# Altium PCB Sensor_Board_v1.0.PcbDoc
Units mil, origin at the board's own origin, x right, y up, seen from the top; angles counter-clockwise.
Board outline 1771.72 x 2087.93 mil, 4 copper layers (Top Layer, PWR, GND, Bottom Layer), stack 61.654 mil thick; 32 components, 20 nets, 104 pads, 98 vias.
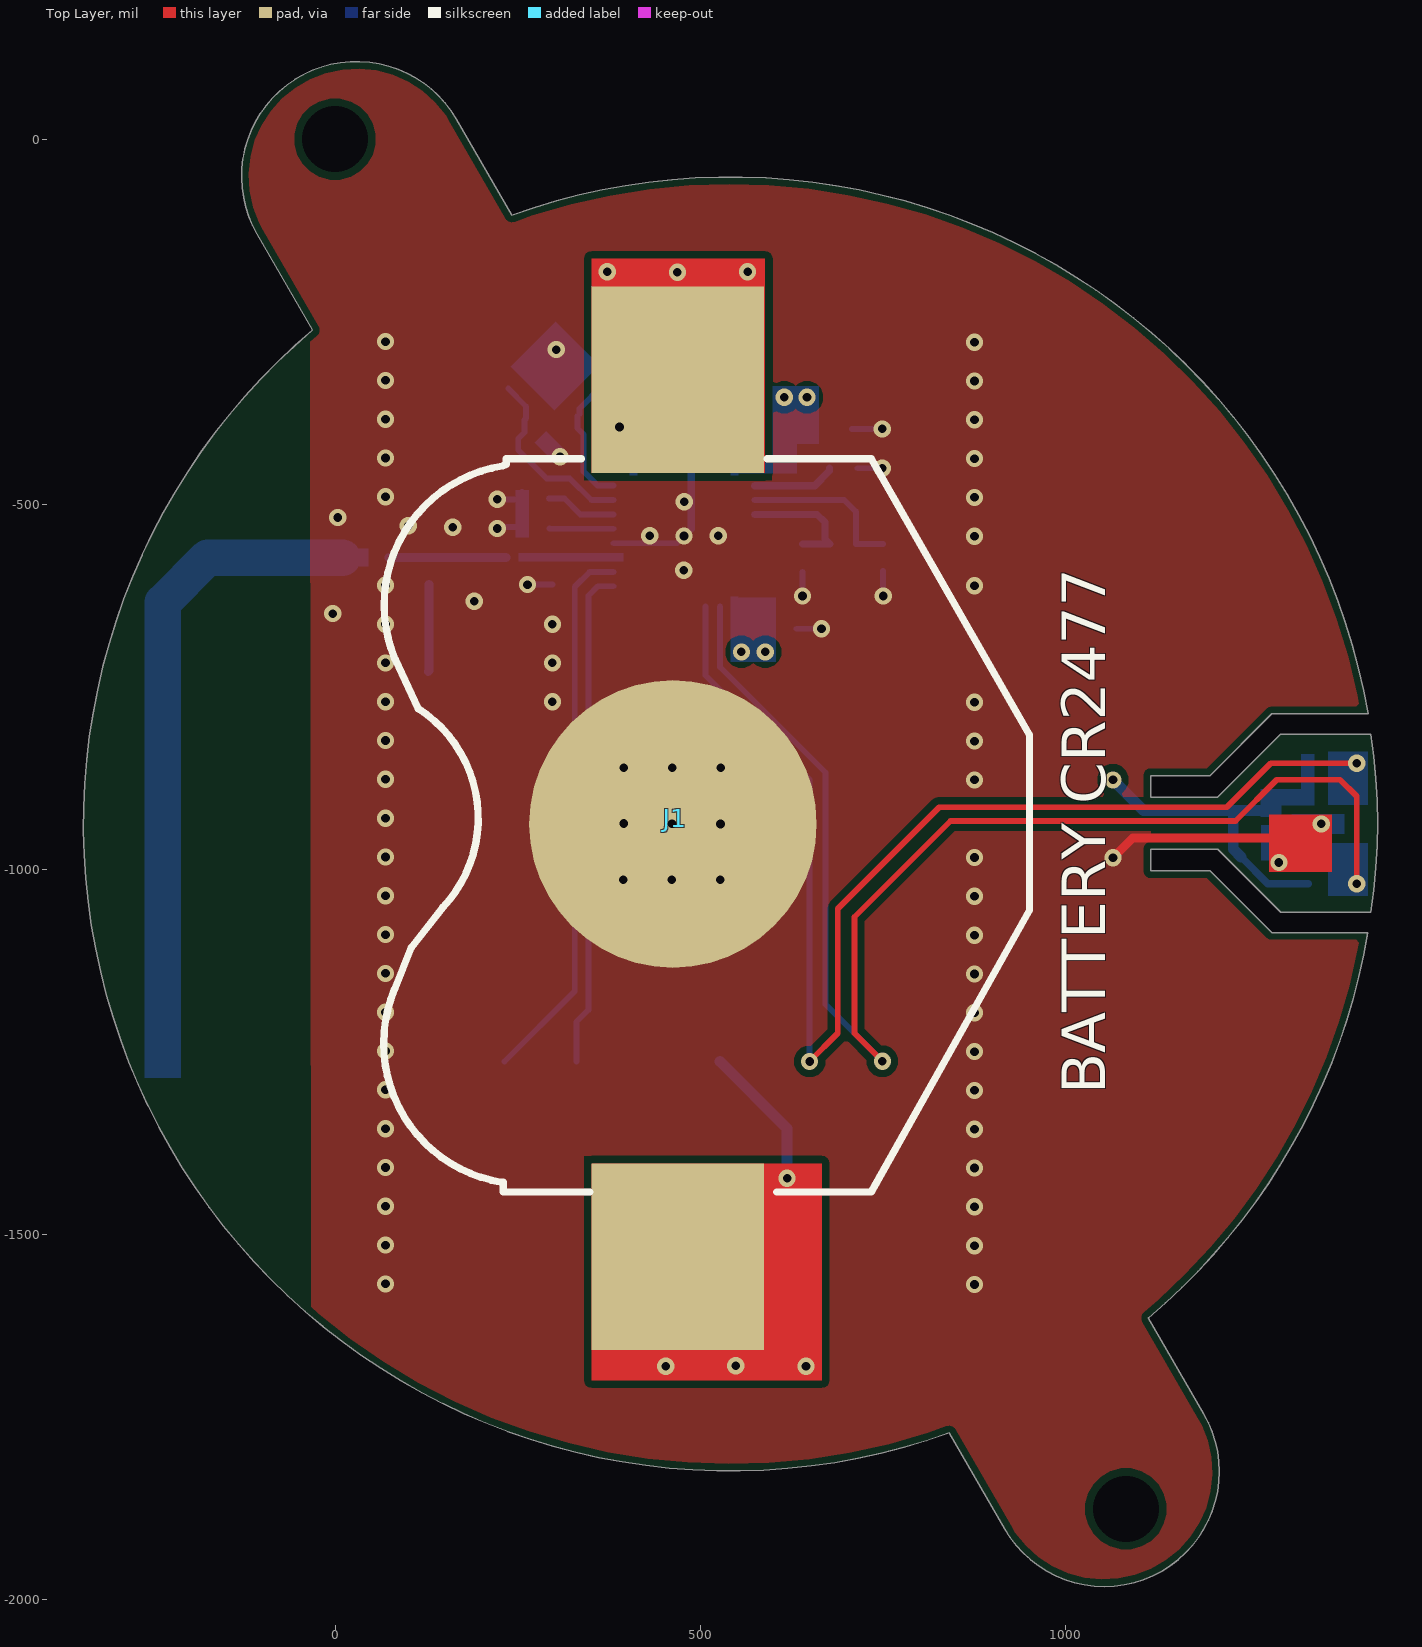
[diagram p0: Top Layer view]
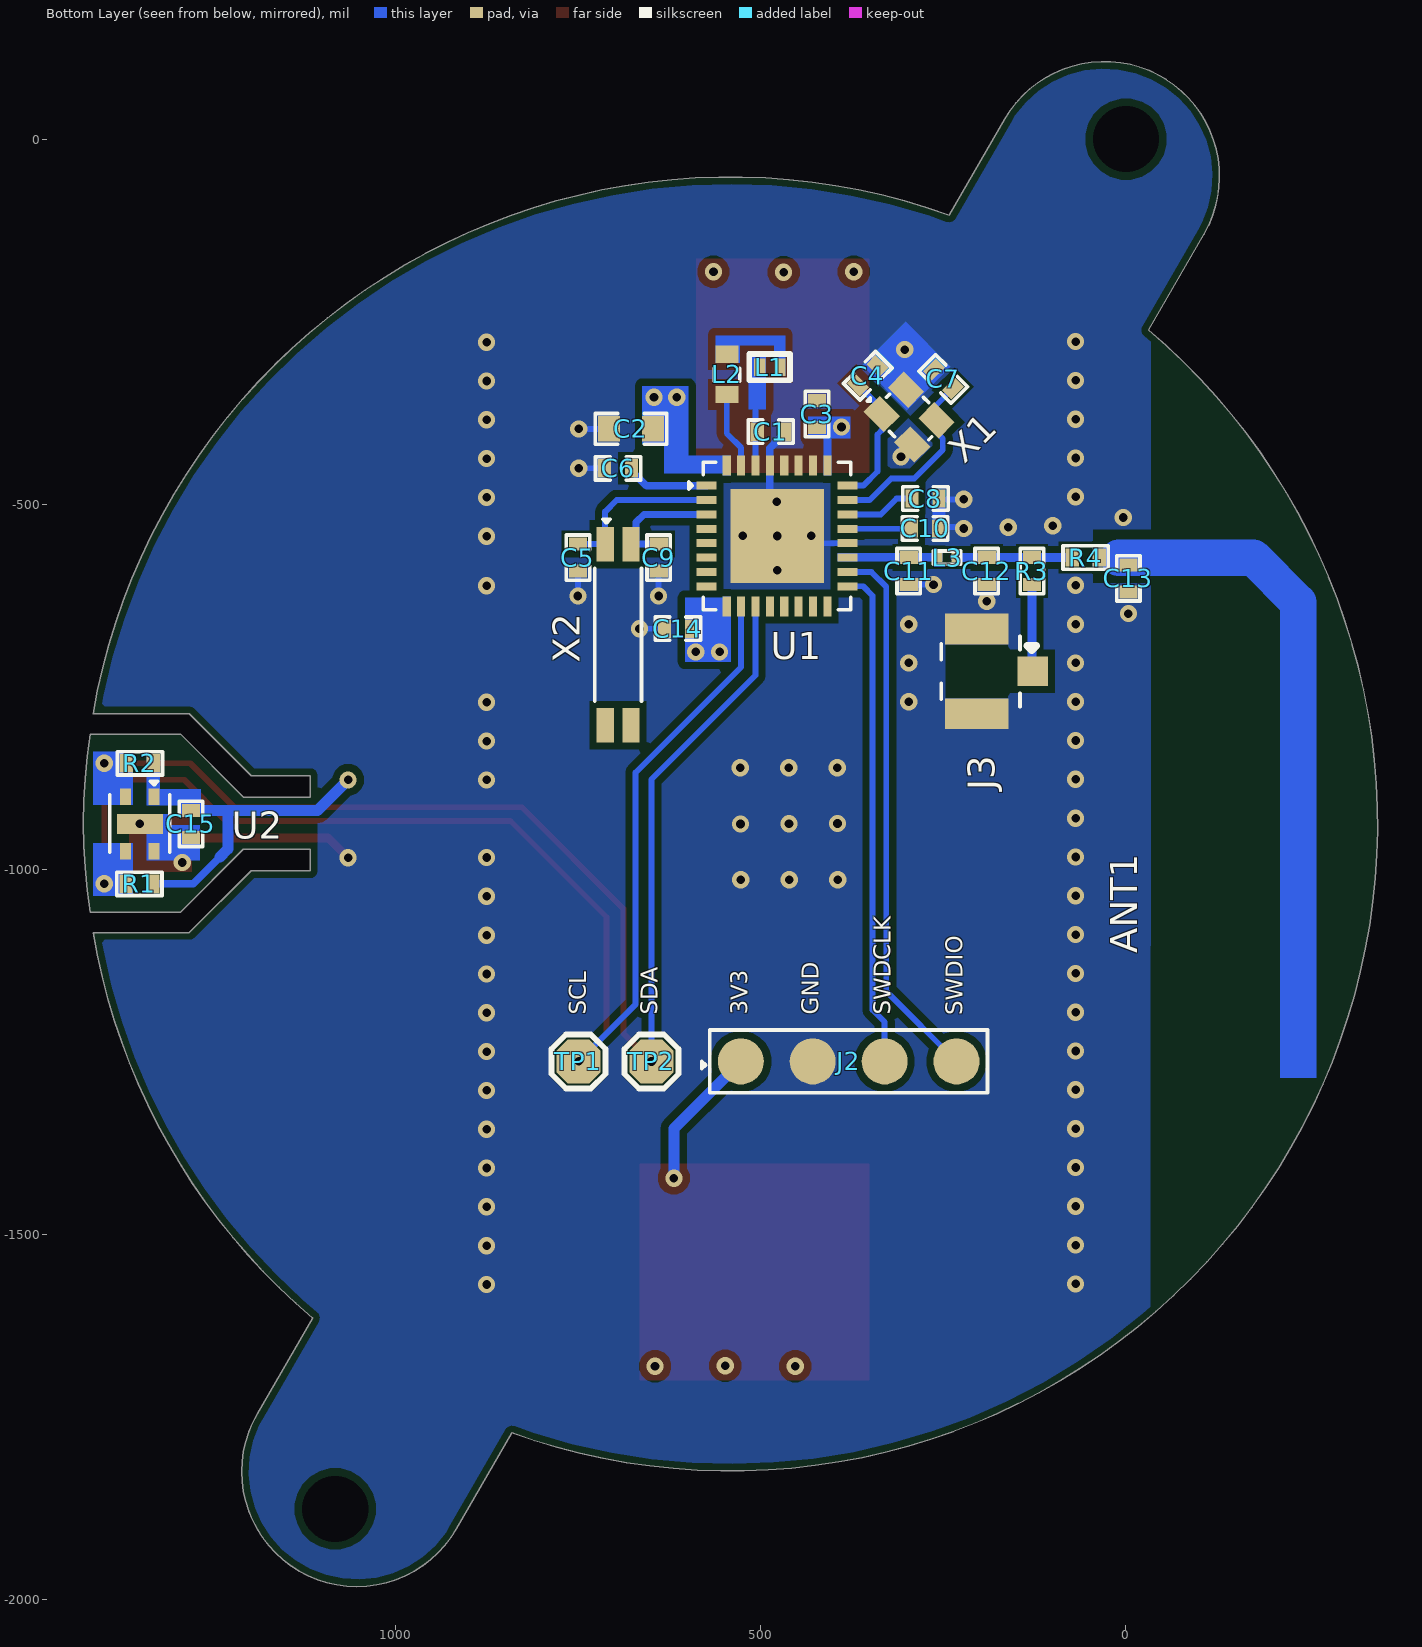
[diagram p1: Bottom Layer view, seen from below]
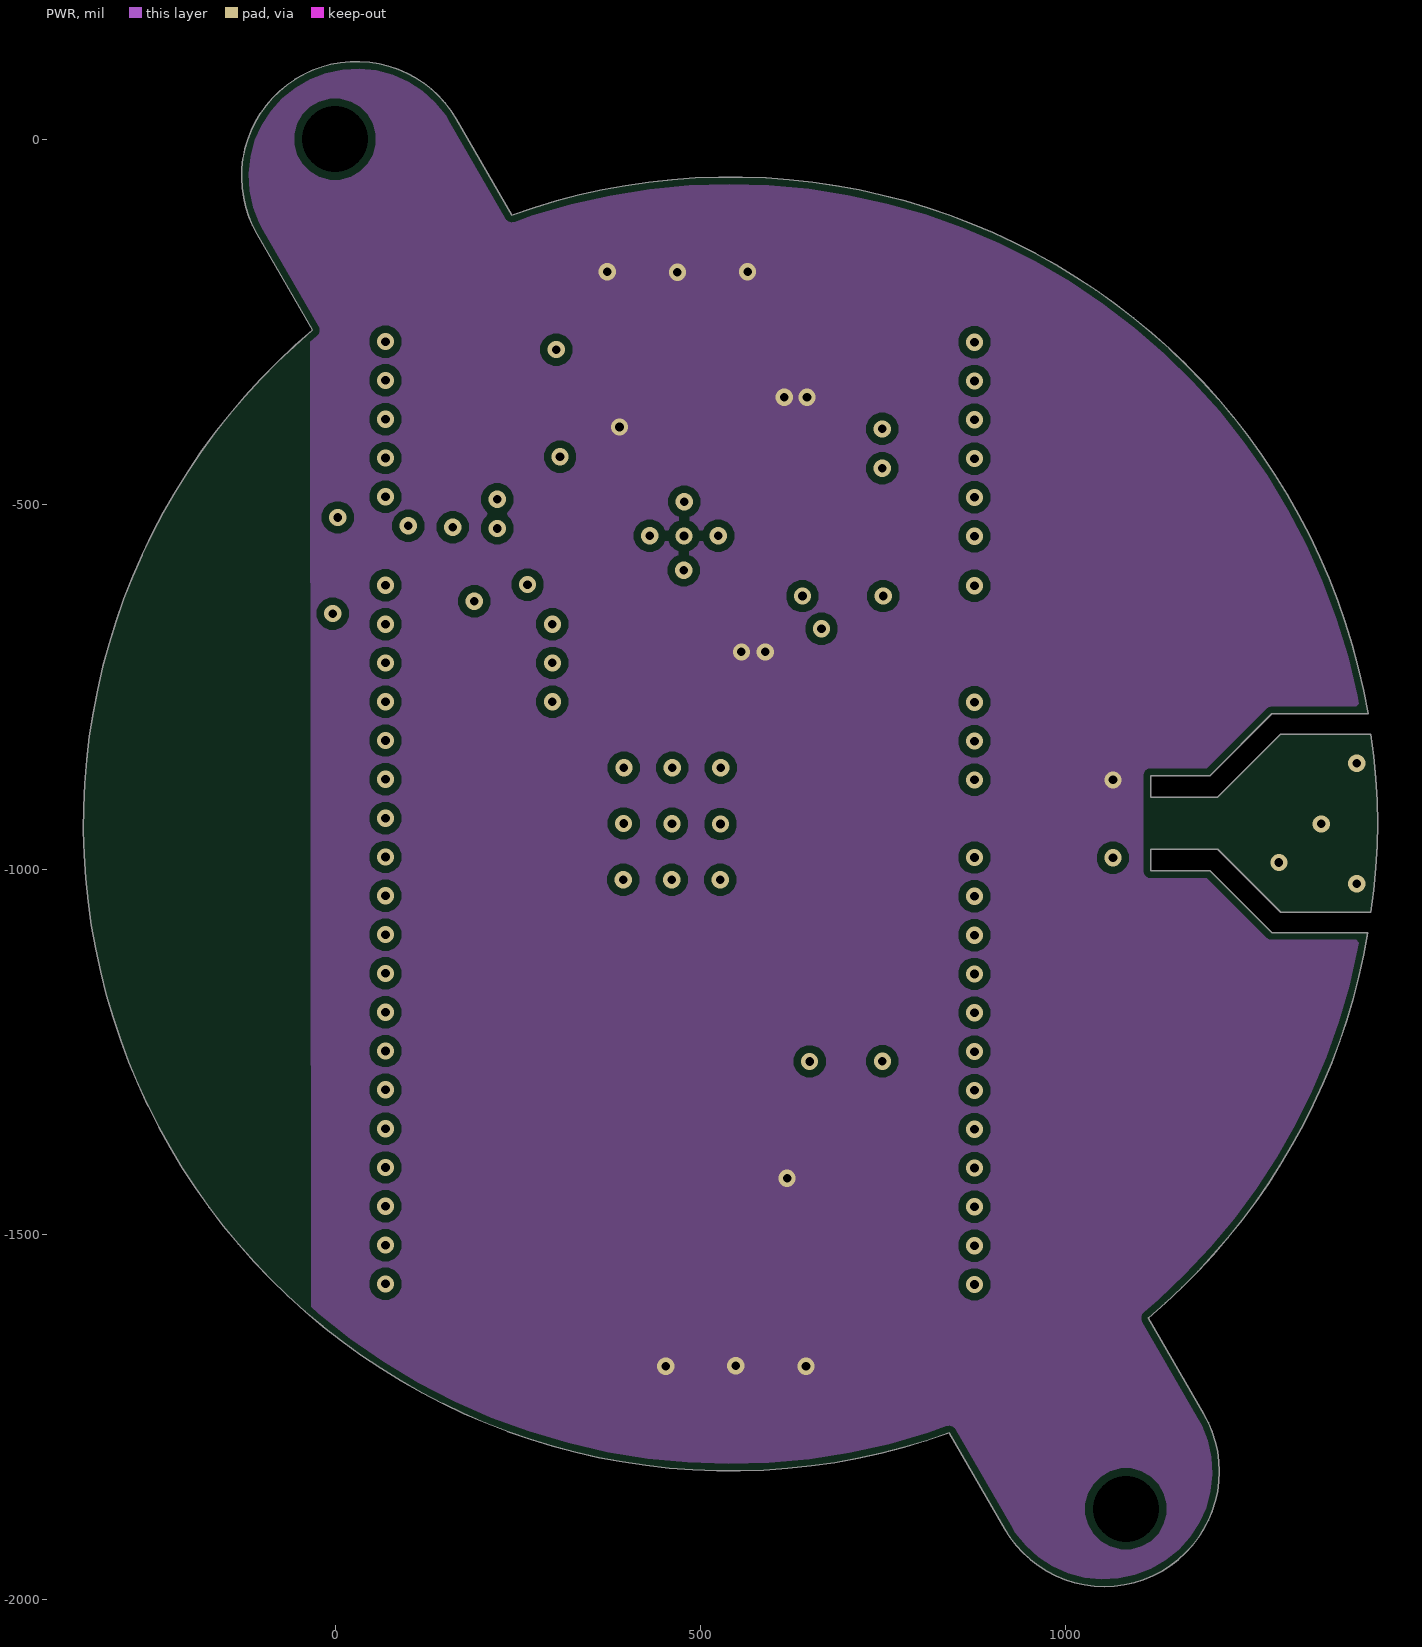
[diagram p2: PWR]
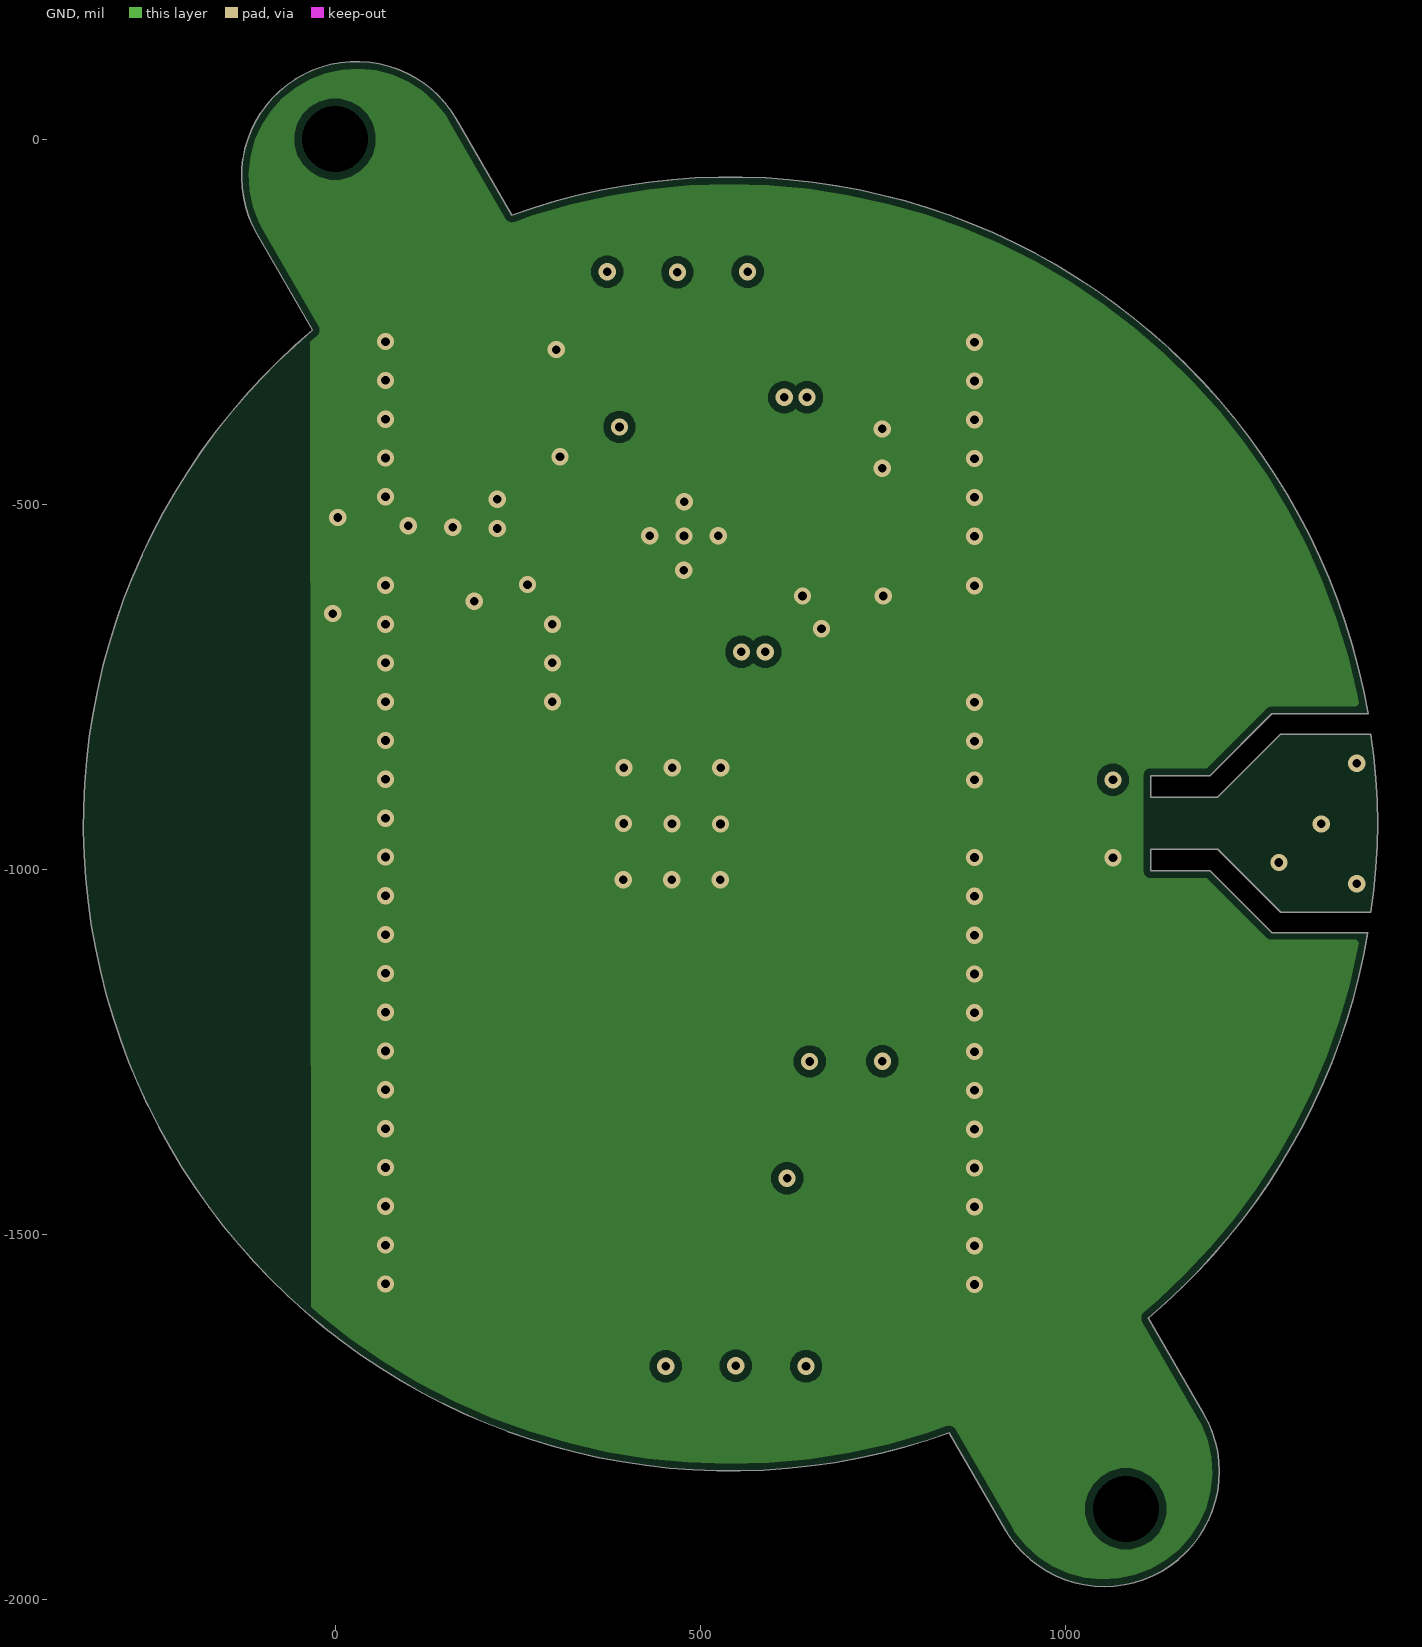
[diagram p3: GND]
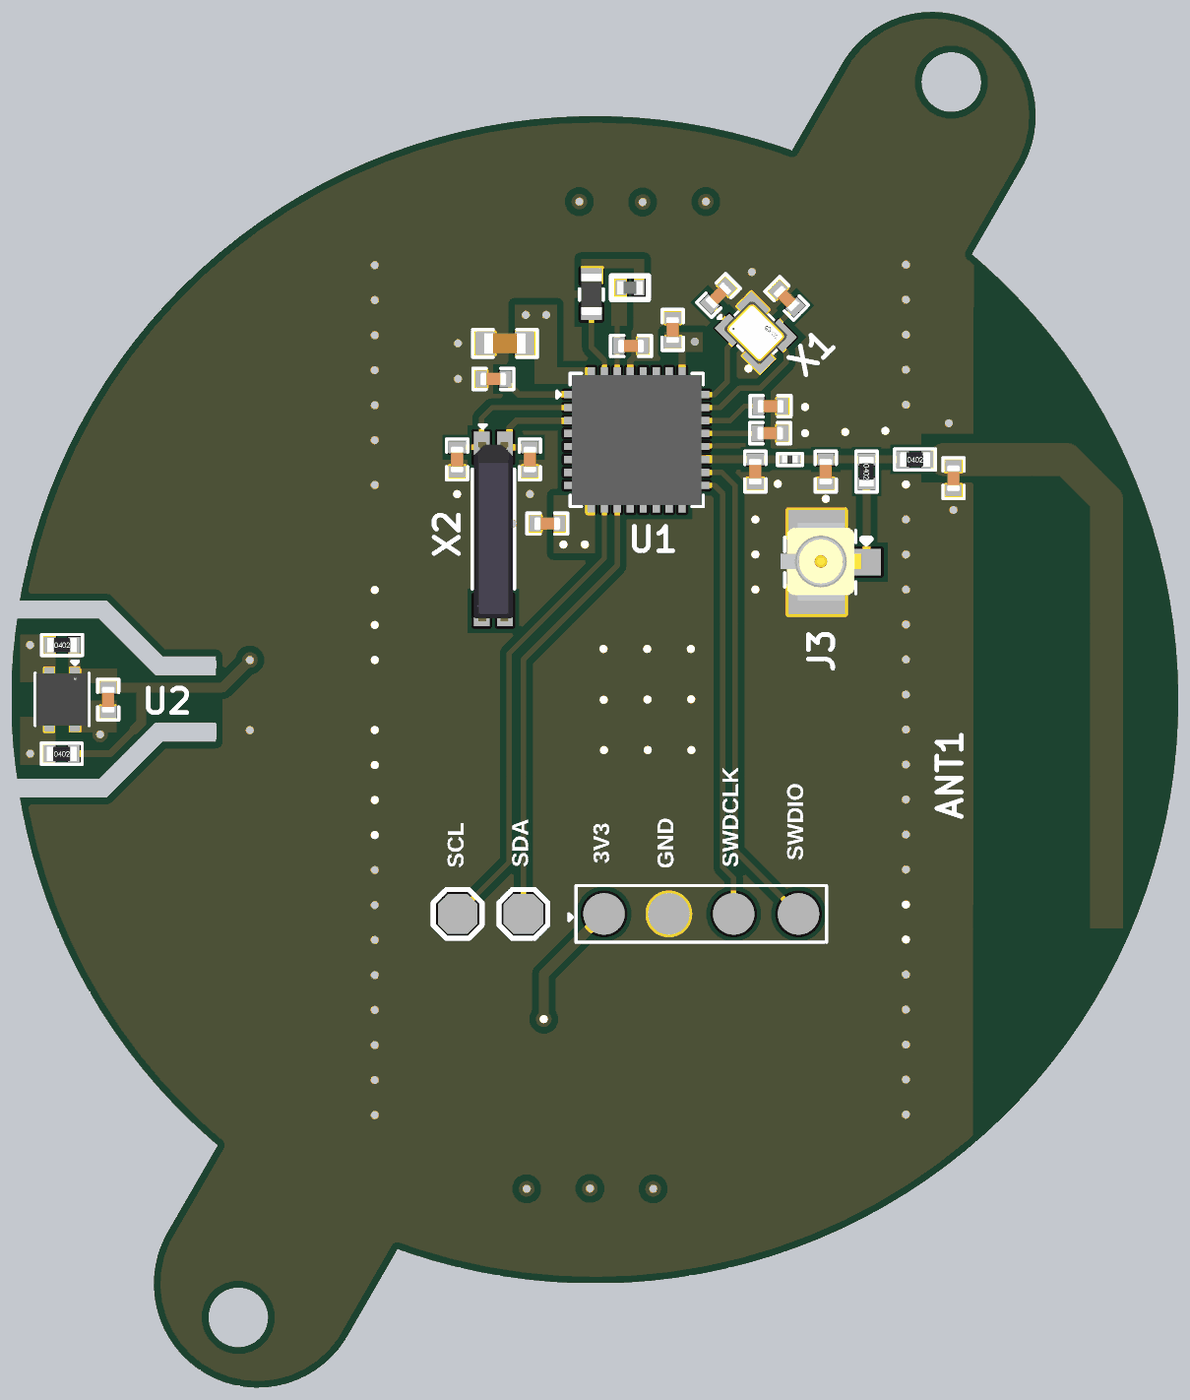
[diagram p4: 3D render of the assembled board from below, using the file's embedded part models]

## Layer stack, top to bottom
Top Solder: solder mask 0.3937, Solder Resist, Dk 3.5
Top Layer: signal copper 1.378
Dielectric 2: prepreg 7.9921, PP-006, Dk 4.4
PWR: signal copper 1.1811
Dielectric 1: core 40.5512, FR-4, Dk 4.6
GND: signal copper 1.1811
Dielectric 3: prepreg 7.9921, PP-006, Dk 4.4
Bottom Layer: signal copper 1.378
Bottom Solder: solder mask 0.3937, Solder Resist, Dk 3.5

## Board outline
840.81,-1771.29 916.77,-1902.85 ccw(c1053.15,-1824.11) 1189.53,-1745.37 1113.58,-1613.81 ccw(c546.11,-941.39) 1413.98,-1086.18 1282.39,-1086.18 1197.7,-1001.5 1116.7,-1001.5 1116.7,-972.29 1208.49,-972.29 1294.64,-1058.44 1418,-1058.44 ccw(c621.35,-936.5) 1418,-814.56 1294.64,-814.56 1208.49,-900.71 1116.7,-900.71 1116.7,-871.5 1197.7,-871.5 1282.39,-786.81 1413.98,-786.81 1414.23,-786.77 ccw(c541.34,-937.63) 241.86,-103.96 165.91,27.6 ccw(c29.53,-51.14) -106.85,-129.88 -30.9,-261.44 ccw(c541.34,-937.63)

## Design rules (kind name [scope] priority, off if disabled: settings)
BoardOutlineClearance [All] p1: gap=0 ignorepadtopadclearanceinfootprint=FALSE except(10: Poly-OutlineEdge)
Clearance Clearance_1 [InComponent('ANT1')] p1: gap=0 ignorepadtopadclearanceinfootprint=TRUE
Clearance [All] p2: gap=10 ignorepadtopadclearanceinfootprint=TRUE except(0: Arc-Hole Track-Hole SMDPad-Hole THPad-Hole Via-Hole Fill-Hole Poly-Hole Region-Hole Text-Hole; 7: SMDPad-Fill; 8: Arc-SMDPad Track-SMDPad; 9: Track-Fill)
ComponentClearance [All] p1: gap=0 collisioncheckmode=3 verticalgap=0 showdistances=FALSE
Height [All] p1: minheight=0 maxheight=1181.1 prefheight=500
MaxMinImpedance "Schematic Impedance Constraint_1" [InNet('RF')] p1: minimum=47.00 maximum=52.00
MaxMinImpedance "Schematic Impedance Constraint" [InNet('NetJ3_1')] p2: minimum=47.00 maximum=52.00
MinimumSolderMaskSliver [All] p1: minsoldermaskwidth=0
PolygonConnect [All] p1: connectstyle=Direct reliefconductorwidth=10 reliefentries=4 polygonreliefangle="90 Angle" airgapwidth=10
RoutingVias [All] p1: holewidth=11.81 width=23.62 viastyle="Through Hole" minholewidth=11.81 minwidth=23.62 maxholewidth=11.81 maxwidth=23.62
ShortCircuit ShortCircuit_1 [InComponent('ANT1')] p1: allowed=TRUE
ShortCircuit [All] p2: allowed=FALSE
SilkToSolderMaskClearance [IsPad] p1: minsilkscreentomaskgap=0 clearancetoexposedcopper=TRUE
SolderMaskExpansion "Via Extended" [IsVia] p1: expansion=4 istentingtop=TRUE
SolderMaskExpansion [All] p2: expansion=4 istentingtop=FALSE
UnRoutedNet [All] p1: checkbadconnections=TRUE
Width Width_1 [InNet('RF')  or InNet('NetJ3_1')] p1: maxlimit=12 minlimit=10 preferedwidth=12 toplayer_minwidth=12 bottomlayer_minwidth=12 impedanceprofiledriven=TRUE impedanceprofileid={D9AAD84A-3DD9-4220-AA67-9D2B0AE319AF} impedanceprofilevalue=50.000000 minimp=50.000000 maximp=50.000000 favimp=50.000000
Width [All] p2: maxlimit=50 minlimit=8 preferedwidth=10 midlayer1_minwidth=10 midlayer1_maxwidth=10 midlayer2_minwidth=10 midlayer2_maxwidth=10 minimp=50.000000 maximp=50.000000 favimp=50.000000
24 further rules are at their usual default settings.

## Components (designator, comment, footprint, x,y, rotation, side; value= is the part's Value field where it differs from the comment)
ANT1 "NRF PCB Antenna" "NRF PCB ANTENNA" 10.16,-572.83 r180 bottom
C1 "1uF" Cap-0402 486.33,-400.53 r180 bottom
C2 "4.7UF" Cap-0603 677.68,-396.71 r180 bottom
C3 "100nF" cap-0402 422.96,-376.3 r270 bottom
C4 "12pF" Cap-0402 353.55,-323.87 r135 bottom
C5 "9pF" Cap-0402 750.35,-572.91 r270 bottom
C6 "100nF" cap-0402 695.37,-450.63 r180 bottom
C7 "12pF" Cap-0402 250.09,-328.33 r45 bottom
C8 "100pF" Cap-0402 274.5,-492 r180 bottom
C9 "9pF" Cap-0402 639.85,-572.91 r270 bottom
C10 "DNP" cap-0402 275,-533 r0 bottom
C11 "0.8pF" Cap-0402 297.59,-591.34 r90 bottom
C12 "DNP" cap-0402 190.68,-591.34 r270 bottom
C13 "1.2pF" Cap-0402 -3.3,-601.33 r90 bottom
C14 "100nF" cap-0402 613.39,-670.27 r180 bottom
C15 "100nF" cap-0402 1280.19,-937.5 r90 bottom
J1 "MY-2477-02" MY-2477-02 466.04,-929.76 r90 top locked
J2 "POGO Connector 4 Pin" "Pogo 4 Pin" 379.68,-1262.71 r180 bottom
J3 "U.FL-R-SMT-1(80)" U.FL-R-SMT-1(80)_ 166.04,-728.71 r90 bottom
L1 "15nH" IND-0402 487.89,-312.14 r180 bottom
L2 "10uH" "IND-0603 (1608 Metric)" 546.56,-322.01 r270 bottom
L3 "3.9nH" IND-0201 245,-572.84 r180 bottom
R1 "2.2K" Res-0402 1350.7,-1019.5 r180 bottom
R2 "2.2K" Res-0402 1350.19,-854.5 r180 bottom
R3 "DNP" Res-0402 128.68,-591.34 r270 bottom
R4 "0R" Res-0402 55.16,-572.84 r180 bottom
TP1 "TEST POINT" Test-point 749.68,-1262.71 r270 bottom
TP2 "TEST POINT" Test-point 649.68,-1262.71 r270 bottom
U1 "NRF52810-QCAA-R" "32-QFN (5x5)" 477.68,-543.31 r180 bottom
U2 "SHTC3-TR-2.5KS" "4-WDFN Exposed Pad" 1350.19,-937.5 r270 bottom
X1 "32MHz" SMD2016-4P 296.98,-380.44 r225 bottom
X2 "32.768KHz" MC-146_ 695.35,-678.39 r270 bottom

## Footprints (in the part's own frame and the unit in brackets; to place one, negate y for a bottom-side part, rotate by r counter-clockwise, add the part's x,y. Pads: shape width x height; smd on the part's side, far side on the other; paste and mask are expansions set on the pad)
"4-WDFN Exposed Pad" [mm]
  rect 0.57x0.38 smd paste+0 mask+0.051: 1(-0.95,0.5) 2(-0.95,-0.5) 3(0.95,-0.5) 4(0.95,0.5)
  rect 0.7x1.6 smd paste+0 mask+0.051: 5(0,0)
  silkscreen extent -1.48,-1.04 0.99,1.04, body extent -1,-1 1,1, height 0.76
"32-QFN (5x5)" [mm] "32pins, 5x5mm body, 0.5mm pitch QFN package"
  rect 0.7x0.28 smd: 1(-2.45,1.75) 2(-2.45,1.25) 3(-2.45,0.75) 4(-2.45,0.25) 5(-2.45,-0.25) 6(-2.45,-0.75) 7(-2.45,-1.25) 8(-2.45,-1.75) 17(2.45,-1.75) 18(2.45,-1.25) 19(2.45,-0.75) 20(2.45,-0.25) 21(2.45,0.25) 22(2.45,0.75) 23(2.45,1.25) 24(2.45,1.75)
  rect 0.28x0.7 smd: 9(-1.75,-2.45) 10(-1.25,-2.45) 11(-0.75,-2.45) 12(-0.25,-2.45) 13(0.25,-2.45) 14(0.75,-2.45) 15(1.25,-2.45) 16(1.75,-2.45) 25(1.75,2.45) 26(1.25,2.45) 27(0.75,2.45) 28(0.25,2.45) 29(-0.25,2.45) 30(-0.75,2.45) 31(-1.25,2.45) 32(-1.75,2.45)
  rect 3.254x3.254 smd: 33(0,0)
  silkscreen extent -3.07,-2.57 2.57,2.57, body extent -2.5,-2.5 2.5,2.5, height 0.85
Cap-0402 [mil]
  rect 18x25 smd mask+2.36: 1(-18.5,0) 2(18.5,0)
  silkscreen extent -31,-16 31,16, body extent -20,-10 20,10, height 19
cap-0402 [mil]
  rect 18x25 smd mask+2.36: 1(-18.5,0) 2(18.5,0)
  silkscreen extent -31,-16 31,16, body extent -20,-10 20,10, height 19
Cap-0603 [mil]
  rect 30x35 smd mask+2.36: 1(-30,0) 2(30,0)
  silkscreen extent -49,-21 49,21, body extent -32,-16 31,16, height 34
IND-0201 [mm]
  rect 0.25x0.3 smd mask+0.055: 1(-0.275,0) 2(0.275,0)
  silkscreen extent -0.48,-0.23 0.48,0.23, body extent -0.3,-0.15 0.3,0.15, height 0.15
IND-0402 [mm]
  rect 0.4x0.6 smd: 1(-0.35,0) 2(0.35,0)
  silkscreen extent -0.71,-0.46 0.71,0.46, body extent -0.5,-0.25 0.5,0.25, height 0.25
"IND-0603 (1608 Metric)" [mm] "0.063\" L x 0.032\" W (1.60mm x 0.80mm)"
  rect 0.6x0.8 smd: 1(-0.7,0) 2(0.7,0)
  silkscreen extent -0.2,-0.46 0.23,0.46, body extent -0.8,-0.4 0.8,0.4, height 0.78
MC-146_ [mm]
  rect 1.2x0.6 smd: 1(-3.15,-0.45) 2(3.15,-0.45) 3(3.15,0.45) 4(-3.15,0.45)
  silkscreen extent -4.01,-0.81 2.31,0.81, body extent -3.35,-0.75 3.55,0.75, height 1.45
MY-2477-02 [mm]
  rect 6.5x6 smd paste-100 mask+0.051: 1(-15.25,-0.087) 2(15.25,-0.087)
  round 10 smd paste-100 mask+0.051: 3(-0.2,0.087)
  silkscreen extent -13,-12.31 12.5,10.15, body extent -18,-12.42 18,10.47, height 8.3
"NRF PCB ANTENNA" [mil]
  Top Layer lines w50: 245.98,-685.07 245.98,-61.39 184.59,0 -0.02,0
"Pogo 4 Pin" [mm]
  round 1.6 smd: 1(-3.75,0) 2(-1.25,0) 3(1.25,0) 4(3.75,0)
  silkscreen extent -5.11,-1.09 4.83,1.09
Res-0402 [mil]
  rect 18x25 smd mask+2.17: 1(-18.5,0) 2(18.5,0)
  silkscreen extent -32,-17 32,16, body extent -23,-11 23,11, height 16
SMD2016-4P [mm]
  rect 1x0.8 smd paste+0 mask+0.051: 1(-0.75,-0.6) 2(0.75,-0.6) 3(0.75,0.6) 4(-0.75,0.6)
  silkscreen extent -1.42,-0.84 1.04,0.84, body extent -1,-0.8 1,0.8, height 0.47
Test-point [mil]
  oct 60x60 smd: 1(0,0)
  silkscreen extent -37,-37 37,37
U.FL-R-SMT-1(80)_ [mm]
  rect 1.02x1.07 smd: 1(0,-0.974)
  rect 1.07x2.2 smd: 2(1.475,0.974) 3(-1.475,0.974)
  silkscreen extent -1.22,-1.09 1.22,2.21, body extent -1.47,-0.74 1.53,2.36, height 1.2

## Part data
ANT1: "PCB Antenna"
C1: library part CL05A105KA5NQNC, "CAP CER 1UF 25V X5R 0402", Case Code (Imperial)=0402, Case Code (Metric)=1005, Dielectric=X5R, LCSC Part Number=C52923, Manufacturer=Samsung, Max Operating Temperature=85°C, Min Operating Temperature=-55°C, Package Quantity=10000, Tolerance=10%, Voltage Rating=25V, Case/Package=0402, Category="Ceramic Capacitors", ComponentLink1Description=https://datasheet.ciiva.com/25720/cl05a105ka5nqnc-25720771.pdf?src-supplier=Digi-Key, ComponentLink1URL=https://datasheet.ciiva.com/25720/cl05a105ka5nqnc-25720771.pdf?src-supplier=Digi-Key, ComponentLink2Description=https://datasheet.ciiva.com/3777/cl05a105ka5nqnc-3777709.pdf?src-supplier=Arrow+Electronics, ComponentLink2URL=https://datasheet.ciiva.com/3777/cl05a105ka5nqnc-3777709.pdf?src-supplier=Arrow+Electronics, ComponentLink3Description=https://datasheet.ciiva.com/29198/459147-da-01-en-vs-kondensator-0402-29198339.pdf?src-supplier=Conrad, ComponentLink3URL=https://datasheet.ciiva.com/29198/459147-da-01-en-vs-kondensator-0402-29198339.pdf?src-supplier=Conrad, Construction=Flat, Depth=0.5mm, Height=0.5mm, Item Type=Capacitor, Lead Free="Lead Free", Length=1mm, Manufacturer Part Number=CL05A105KA5NQNC, Material=Ceramic, Mounting Technology="Surface Mount", Packaging="Tape and Reel", Pricing 1="10000=0.0256, 20000=0.0238, 30000=0.0228, 50000=0.0207, 100000=0.0175, 250000=0.0157 (USD)", Radiation Hardening=No, RoHS=Yes, RoHS Compliant=Yes, Series=CL, Stock 1=80000, Supplier 1="Arrow Electronics", Supplier Part Number 1=CL05A105KA5NQNC, Thickness=0.022inch, Width=0.02inch
C2: library part CL10A475KA8NQNC, "CAP CER 4.7UF 25V X5R 0603", Capacitance=4.7uF, Case Code (Imperial)=0603, Case Code (Metric)=1608, Dielectric=X5R, LCSC Part Number=C69335, Manufacturer=Samsung, Max Operating Temperature=85°C, Min Operating Temperature=-55°C, Package Quantity=1, Supplier Part Number 1=1276-1900-1-ND, Tolerance=10%, Voltage Rating=25V, Case/Package=0603, ComponentLink1Description=http://www.samsungsem.com/kr/support/product-search/mlcc/CL10A475KA8NQNC.jsp?src-supplier=Digi-Key, ComponentLink1URL=http://www.samsungsem.com/kr/support/product-search/mlcc/CL10A475KA8NQNC.jsp?src-supplier=Digi-Key, Contact Plating=Tin, Depth=0.8mm, Lead Free="Lead Free", Length=1.6mm, Manufacturer Part Number=CL10A475KA8NQNC, Mount="Surface Mount", Packaging="Tape and Reel", Pricing 1="1=0.37, 10=0.255, 100=0.1528, 500=0.11456, 1000=0.09675 (USD)", Stock 1=2252340, Supplier 1=Digi-Key, Termination=Wraparound, Thickness=0.035inch, Width=0.031inch
C3 C6 C10 C12 C14 C15: library part C1005X7R1H104KT000F, "CAP CER 0.1UF 50V X7R 0402", Dielectric=X7R, LCSC Part Number=C361198, Manufacturer=TDK, Tolerance=10%, Voltage=25V, Category="Ceramic Capacitors", ComponentLink1Description=LCSC, ComponentLink1URL=https://www.lcsc.com/product-detail/Multilayer-Ceramic-Capacitors-MLCC-SMD-SMT_TDK-C1005X7R1H104KT000F_C361198.html, Item Type=Capacitor, Manufacturer Part Number=C1005X7R1H104KT000F, RoHS=No, Supplier 1=Avnet, Supplier Part Number 1=C1005X7R1H104KT000F
C4 C7: library part GJM1555C1H120GB01D, "CAP CER 12PF 50V C0G/NP0 0402", Case Code (Imperial)=0402, Case Code (Metric)=1005, Dielectric=C0G, LCSC Part Number=C161305, Manufacturer=Murata, Max Operating Temperature=125°C, Min Operating Temperature=-55°C, Package Quantity=10000, Supplier Part Number 1=490-8078-1-ND, Tolerance=2%, Voltage Rating=50V, Capacitance=12pF, Case/Package=0402, Category="Ceramic Capacitors", ComponentLink1Description=https://datasheet.ciiva.com/11608/product-11608208.pdf?src-supplier=Avnet, ComponentLink1URL=https://datasheet.ciiva.com/11608/product-11608208.pdf?src-supplier=Avnet, ComponentLink2Description=https://datasheet.ciiva.com/29542/partnumbering-e-01-29542716.pdf?src-supplier=Digi-Key, ComponentLink2URL=https://datasheet.ciiva.com/29542/partnumbering-e-01-29542716.pdf?src-supplier=Digi-Key, ComponentLink3Description=https://datasheet.ciiva.com/29542/partnumbering-e-01-29542715.pdf?src-supplier=Digi-Key, ComponentLink3URL=https://datasheet.ciiva.com/29542/partnumbering-e-01-29542715.pdf?src-supplier=Digi-Key, ComponentLink4Description=https://datasheet.ciiva.com/29542/partnumbering-e-01-29542717.pdf?src-supplier=Digi-Key, ComponentLink4URL=https://datasheet.ciiva.com/29542/partnumbering-e-01-29542717.pdf?src-supplier=Digi-Key, Construction=Flat, Depth=0.5mm, Height=0.5mm, Lead Free="Lead Free", Length=1mm, Manufacturer Part Number=GJM1555C1H120GB01D, Mount="Surface Mount", Packaging="Tape and Reel", Pricing 1="1=0.18000, 10=0.12600, 50=0.07560, 100=0.06390, 500=0.04370, 1000=0.03865, 2500=0.03698, 5000=0.03361 (USD)", Radiation Hardening=No, RoHS=Yes, RoHS Compliant=Yes, Series=GJM, Stock 1=266975, Supplier 1=Digi-Key, Termination=SMD/SMT, Thickness=0.022inch, Voltage Rating (DC)=50V, Width=0.5mm
C5 C9: library part 0402CG9R0C500NT, "50V 9pF C0G 0402 Multilayer Ceramic Capacitors MLCC - SMD/SMT ROHS", LCSC Part Number=C1580, Manufacturer="FH (Guangdong Fenghua Advanced Tech)", Package=0402, ComponentLink1Description=LCSC, ComponentLink1URL=https://www.lcsc.com/product-detail/Multilayer-Ceramic-Capacitors-MLCC-SMD-SMT_FH-Guangdong-Fenghua-Advanced-Tech-0402CG9R0C500NT_C1580.html, Item Type=Capacitor, Manufacturer Part Number=0402CG9R0C500NT
C8: library part CC0402JRNPO9BN101, "CAP CER 100PF 50V C0G/NPO 0402", Case Code (Imperial)=0402, Case Code (Metric)=1005, Dielectric=C0G, Dielectric Material=Ceramic, Insulation Resistance=100GR, LCSC Part Number=C106200, Manufacturer=Yageo, Max Operating Temperature=125°C, Min Operating Temperature=-55°C, Package Quantity=1, Supplier Part Number=8934564, Temperature Coefficient=30ppm/°C, Tolerance=5%, Voltage=50V, Case/Package=0402, Category="Ceramic Capacitors", ComponentLink1Description=https://datasheet.ciiva.com/11786/0900766b80d84fbf-11786101.pdf?src-supplier=Rs, ComponentLink1URL=https://datasheet.ciiva.com/11786/0900766b80d84fbf-11786101.pdf?src-supplier=Rs, ComponentLink2Description=https://datasheet.ciiva.com/23767/25787-23767888.pdf?src-supplier=Newark, ComponentLink2URL=https://datasheet.ciiva.com/23767/25787-23767888.pdf?src-supplier=Newark, ComponentLink3Description=https://datasheet.ciiva.com/28450/1443161-28450220.pdf?src-supplier=Element14, ComponentLink3URL=https://datasheet.ciiva.com/28450/1443161-28450220.pdf?src-supplier=Element14, ComponentLink4Description=https://datasheet.ciiva.com/8033/1443161-8033598.pdf?src-supplier=Element14, ComponentLink4URL=https://datasheet.ciiva.com/8033/1443161-8033598.pdf?src-supplier=Element14, ComponentLink5Description=https://datasheet.ciiva.com/143/mlccorderingcode-143990.pdf?src-supplier=Digi-Key, ComponentLink5URL=https://datasheet.ciiva.com/143/mlccorderingcode-143990.pdf?src-supplier=Digi-Key, ComponentLink6Description=https://datasheet.ciiva.com/143/mlccorderingcode-143989.pdf?src-supplier=Digi-Key, ComponentLink6URL=https://datasheet.ciiva.com/143/mlccorderingcode-143989.pdf?src-supplier=Digi-Key, ComponentLink7Description=https://datasheet.ciiva.com/143/mlccorderingcode-143991.pdf?src-supplier=Digi-Key, ComponentLink7URL=https://datasheet.ciiva.com/143/mlccorderingcode-143991.pdf?src-supplier=Digi-Key, Depth=0.5mm, Height=0.5mm, Item Type=Capacitor, Lead Free="Lead Free", Length=1mm, Manufacturer Part Number=CC0402JRNPO9BN101, Mounting Technology="Surface Mount", Packaging="Tape and Reel", Pins=2, Pricing="10000=0.002, 40000=0.0019, 150000=0.0018, 400000=0.0018, 1000000=0.0017 (USD)", Radiation Hardening=No, Reach SVHC Compliant=No, RoHS=Yes, RoHS Compliant=Yes, Series=CC, Stock=11720000, Supplier="Future Electronics", Termination=SMD/SMT, Thickness=0.022inch, Voltage Rating=50V, Voltage Rating (DC)=50V, Width=0.02inch
C11: library part CC0402BRNPO9BNR80, "CAP CER 0.8PF 50V C0G/NPO 0402", Case Code (Imperial)=0402, Case Code (Metric)=1005, Dielectric=C0G, LCSC Part Number=C327032, Manufacturer=Yageo, Max Operating Temperature=125°C, Min Operating Temperature=-55°C, Supplier Part Number=4783825, Voltage Rating=50V, Case/Package=0402, Category="Ceramic Capacitors", ComponentLink1Description=http://www.mouser.com/ds/2/447/Yageo_UPY-GP_NP0_16V-to-50V_9-358835.pdf?src-supplier=Mouser, ComponentLink1URL=http://www.mouser.com/ds/2/447/Yageo_UPY-GP_NP0_16V-to-50V_9-358835.pdf?src-supplier=Mouser, ComponentLink2Description=https://datasheet.octopart.com/CC0402BRNPO9BNR80-Yageo-datasheet-151948684.pdf?src-supplier=Newark, ComponentLink2URL=https://datasheet.octopart.com/CC0402BRNPO9BNR80-Yageo-datasheet-151948684.pdf?src-supplier=Newark, ComponentLink3Description=http://www.yageo.com/documents/recent/UPY-GP_NP0_16V-to-50V_16.pdf?src-supplier=Digikey, ComponentLink3URL=http://www.yageo.com/documents/recent/UPY-GP_NP0_16V-to-50V_16.pdf?src-supplier=Digikey, ComponentLink4Description=https://www.yageo.com/upload/media/product/productsearch/datasheet/mlcc/UPY-GP_NP0_16V-to-50V_18.pdf?src-supplier=Digikey, ComponentLink4URL=https://www.yageo.com/upload/media/product/productsearch/datasheet/mlcc/UPY-GP_NP0_16V-to-50V_18.pdf?src-supplier=Digikey, ComponentLink5Description=https://datasheet.octopart.com/CC0402BRNPO9BNR80-Yageo-datasheet-151948684.pdf?src-supplier=Farnell, ComponentLink5URL=https://datasheet.octopart.com/CC0402BRNPO9BNR80-Yageo-datasheet-151948684.pdf?src-supplier=Farnell, ComponentLink6Description=https://datasheet.octopart.com/CC0402BRNPO9BNR80-Yageo-datasheet-137875056.pdf?src-supplier=Future+Electronics, ComponentLink6URL=https://datasheet.octopart.com/CC0402BRNPO9BNR80-Yageo-datasheet-137875056.pdf?src-supplier=Future+Electronics, Halogen Free=5694HalogenFree, Item Type=Capacitor, Lead Free=5697LeadFree, Length=0.039inch, Manufacturer Part Number=CC0402BRNPO9BNR80, Mounting Technology="Surface Mount", Packaging="Tape and Reel", Pricing="10000=0.0034, 40000=0.0032, 150000=0.0031, 250000=0.003, 500000=0.0028 (USD)", RoHS=Yes, RoHS Compliant=Yes, Series=CC, Stock=70000, Supplier="Future Electronics", Termination=SMD/SMT, Thickness=0.022inch, Voltage Rating (DC)=50V, Weight=2.3E-05oz, Width=0.02inch
C13: library part CC0402BRNPO9BN1R2, "CAP CER 1.2PF 50V C0G/NPO 0402", LCSC Part Number=C327292, Manufacturer=Yageo, Temperature Coefficient=30ppm/°C, ComponentLink1Description=https://datasheet.ciiva.com/13386/upy-gp-np0-16v-to-50v-8-13386283.pdf?src-supplier=Mouser, ComponentLink1URL=https://datasheet.ciiva.com/13386/upy-gp-np0-16v-to-50v-8-13386283.pdf?src-supplier=Mouser, ComponentLink2Description=https://datasheet.ciiva.com/15189/getdatasheetpartid-468320-15189100.pdf?src-supplier=Verical, ComponentLink2URL=https://datasheet.ciiva.com/15189/getdatasheetpartid-468320-15189100.pdf?src-supplier=Verical, ComponentLink3Description=https://datasheet.ciiva.com/11587/upy-gp-np0-16v-to-50v-8-11587117.pdf?src-supplier=Avnet, ComponentLink3URL=https://datasheet.ciiva.com/11587/upy-gp-np0-16v-to-50v-8-11587117.pdf?src-supplier=Avnet, Halogen Free=5694HalogenFree, Item Type=Capacitor, Manufacturer Part Number=CC0402BRNPO9BN1R2, Pricing="1=0.1, 10=0.032, 50=0.0184, 100=0.0142, 500=0.01068, 1000=0.00839, 2500=0.00762, 5000=0.00702 (USD)", RoHS=Yes, Stock=92678, Supplier=Digikey
J1: "Battery clip Nickel -25℃~+85℃ Phosphor Bronze CR2477 SMD Button And Strip Battery Connector ROHS", LCSC Part Number=C2979175, Manufacturer=MYOUNG, Package=SMD, ComponentLink1Description=LCSC, ComponentLink1URL=https://www.lcsc.com/product-detail/Button-And-Strip-Battery-Connector_MYOUNG-MY-2477-02_C2979175.html, Item Type="Battery Connector", Manufacturer Part Number=MY-2477-02
J2: "Pogo Pad 2.5mm 4 Pin", Item Type="Pogo Connector", Manufacturer Part Number="POGO Connector 4 Pin"
J3: "CONN U.FL RCPT STR 50 OHM SMD", Case/Package=SMD/SMT, LCSC Part Number=C88374, Manufacturer=Hirose, Package Quantity=10000, Supplier Part Number 1=U.FL-R-SMT-1(80)-CUTT, ComponentLink1Description=https://www.hirose.com/product/en/download_file/key_name/U.FL-R-SMT-1%2880%29/category/Specification%20Sheet/doc_file_id/37638/?file_category_id=9&item_id=03310472280&is_series=&src-supplier=Digi-Key, ComponentLink1URL=https://www.hirose.com/product/en/download_file/key_name/U.FL-R-SMT-1%2880%29/category/Specification%20Sheet/doc_file_id/37638/?file_category_id=9&item_id=03310472280&is_series=&src-supplier=Digi-Key, ComponentLink2Description=http://www.mouser.com/ds/2/185/U.FL_catalog-939761.pdf?src-supplier=Mouser, ComponentLink2URL=http://www.mouser.com/ds/2/185/U.FL_catalog-939761.pdf?src-supplier=Mouser, Item Type="UFL Connector", Lead Free="Lead Free", Manufacturer Part Number=U.FL-R-SMT-1(80), Packaging="Tape and Reel", Pricing 1="1=1.07, 500=0.785, 1500=0.74, 2500=0.72, 5000=0.695 (USD)", Stock 1=1272, Supplier 1="Future Electronics"
L1: library part LQG15HN15NJ02D, "FIXED IND 15NH 400MA 0.45OHM SMD", Case Code (Imperial)=0402, Case Code (Metric)=1005, Current Rating=300mA, DC Resistance (DCR)=460mR, Inductance Tolerance=5%, LCSC Part Number=C97979, Manufacturer=Murata, Max Operating Temperature=125°C, Min Operating Temperature=-55°C, Package Quantity=1, Self Resonant Frequency=2.3GHz, Test Frequency=100MHz, Case/Package=0402, ComponentLink1Description=https://datasheet.ciiva.com/11801/0900766b80f10808-11801397.pdf?src-supplier=Rs, ComponentLink1URL=https://datasheet.ciiva.com/11801/0900766b80f10808-11801397.pdf?src-supplier=Rs, ComponentLink2Description=https://datasheet.ciiva.com/8002/66026-8002488.pdf?src-supplier=Element14, ComponentLink2URL=https://datasheet.ciiva.com/8002/66026-8002488.pdf?src-supplier=Element14, ComponentLink3Description=https://datasheet.ciiva.com/29696/l0075s0083lqg15hn-29696702.pdf?src-supplier=Digikey, ComponentLink3URL=https://datasheet.ciiva.com/29696/l0075s0083lqg15hn-29696702.pdf?src-supplier=Digikey, ComponentLink4Description=https://datasheet.ciiva.com/1063/l0075s0083lqg15hn-1063850.pdf?src-supplier=Digikey, ComponentLink4URL=https://datasheet.ciiva.com/1063/l0075s0083lqg15hn-1063850.pdf?src-supplier=Digikey, ComponentLink5Description=https://datasheet.ciiva.com/29696/l0075s0083lqg15hn-29696703.pdf?src-supplier=Digikey, ComponentLink5URL=https://datasheet.ciiva.com/29696/l0075s0083lqg15hn-29696703.pdf?src-supplier=Digikey, Core Material=Air, DC Current=300mA, Depth=0.55mm, ESR=450mR, Height=0.5mm, Height - Seated (Max)=0.022inch, Item Type=Inductor, Length=0.039inch, Manufacturer Part Number=LQG15HN15NJ02D, Max Current Rating=300mA, Max DC Current=300mA, Military Standard=Not, Mounting Technology="Surface Mount", Packaging="Tape and Reel", Pricing="1=0.1, 10=0.037, 50=0.037, 100=0.029, 1000=0.022, 10000=0.018 (USD)", Q Factor=8, Reach SVHC Compliant=No, RoHS=Yes, RoHS Compliant=Yes, Series=LQG15HS, Shielding=Unshielded, Stock=45308, Supplier=Mouser, Termination=SMD/SMT, Tolerance=5%, Width=0.02inch
L2: library part LBMF1608T100K, "FIXED IND 10UH 80MA 360 MOHM SMD", Case Code (Imperial)=0603, Case Code (Metric)=1608, DC Current=80mA, DC Resistance (DCR)=360mR, Inductance Tolerance=10%, LCSC Part Number=C87216, Manufacturer="Taiyo Yuden", Max Operating Temperature=105°C, Min Operating Temperature=-40°C, Self Resonant Frequency=32MHz, Test Frequency=2.52MHz, Case/Package=0603, ComponentLink1Description=https://datasheet.ciiva.com/26872/getdatasheetpartid-637440-26872437.pdf?src-supplier=Verical, ComponentLink1URL=https://datasheet.ciiva.com/26872/getdatasheetpartid-637440-26872437.pdf?src-supplier=Verical, ComponentLink2Description=https://datasheet.ciiva.com/15986/610lbmf1608t100k-15986589.pdf?src-supplier=Onlinecomponents.com, ComponentLink2URL=https://datasheet.ciiva.com/15986/610lbmf1608t100k-15986589.pdf?src-supplier=Onlinecomponents.com, ComponentLink3Description=https://datasheet.ciiva.com/1040/lbmf1608t100k-ss-1040360.pdf?src-supplier=Digikey, ComponentLink3URL=https://datasheet.ciiva.com/1040/lbmf1608t100k-ss-1040360.pdf?src-supplier=Digikey, ComponentLink4Description=https://datasheet.ciiva.com/8504/lbmf1608t100k-ss-8504740.pdf?src-supplier=Avnet, ComponentLink4URL=https://datasheet.ciiva.com/8504/lbmf1608t100k-ss-8504740.pdf?src-supplier=Avnet, ComponentLink5Description=https://datasheet.ciiva.com/46395/1497259-46395174.pdf?src-supplier=Element14, ComponentLink5URL=https://datasheet.ciiva.com/46395/1497259-46395174.pdf?src-supplier=Element14, Core Material=Ferrite, Depth=0.9mm, ESR=468mR, Height=0.35mm, Item Type=Inductors, Lead Pitch=0.7mm, Length=1.6mm, Manufacturer Part Number=LBMF1608T100K, Max DC Current=80mA, Military Standard=Not, Mounting Technology="Surface Mount", Packaging="Tape and Reel", Pricing="1=0.13, 10=0.103, 25=0.0936, 50=0.0866, 100=0.0802, 250=0.07256, 500=0.06724, 1000=0.0623 (USD)", Radiation Hardening=No, Reach SVHC Compliant=Unknown, RMS Current (Irms)=80mA, RoHS=Yes, RoHS Compliant=Yes, Series="LB, MF Type", Shielding=Unshielded, Stock=2726337, Supplier=Digikey, Termination=SMD/SMT, Tolerance=10%, Weight=7.1E-05oz, Width=0.8mm
L3: library part LQP03TG3N9B02D, "FIXED IND 3.9NH 350MA 350MOHM SM", Case/Package=0201, Current Rating=350mA, DC Resistance (DCR)=350mR, LCSC Part Number=C86114, Manufacturer=Murata, Max Operating Temperature=125°C, Min Operating Temperature=-55°C, Package Quantity=15000, Self Resonant Frequency=6GHz, Test Frequency=500MHz, ComponentLink1Description=https://datasheet.ciiva.com/29691/jelf243c-0016-29691349.pdf?src-supplier=Digikey, ComponentLink1URL=https://datasheet.ciiva.com/29691/jelf243c-0016-29691349.pdf?src-supplier=Digikey, DC Current=350mA, Depth=0.33mm, Height=0.3mm, Height - Seated (Max)=0.013inch, Item Type=Inductors, Length=0.024inch, Manufacturer Part Number=LQP03TG3N9B02D, Max DC Current=350mA, Military Standard=Not, Mounting Technology="Surface Mount", Packaging="Tape and Reel", Pricing="1=0.1, 10=0.025, 25=0.0224, 50=0.0208, 100=0.0193, 250=0.01748, 500=0.0162, 1000=0.01502, 2500=0.01358 (USD)", RoHS=Yes, RoHS Compliant=Yes, Series=LQP03TG_02, Shielding=Unshielded, Stock=170, Supplier=Digikey, Technology="THIN FILM", Width=0.012inch
R1 R2: library part RC0402FR-072K2L, "RES SMD 2.2K OHM 1% 1/16W 0402", Case Code (Imperial)=0402, Case Code (Metric)=1005, LCSC Part Number=C114762, Manufacturer=Yageo, Max Operating Temperature=155°C, Max Power Dissipation=63mW, Min Operating Temperature=-55°C, Resistance=2.2kR, Resistance Tolerance=1%, Resistor Type="Thick Film", Supplier Part Number 1=311-2.20KLRCT-ND, Temperature Coefficient=100ppm/°C, Voltage Rating=50V, Case/Package=0402, ComponentLink1Description=http://www.farnell.com/datasheets/2167052.pdf?src-supplier=Element14, ComponentLink1URL=http://www.farnell.com/datasheets/2167052.pdf?src-supplier=Element14, ComponentLink2Description=http://www.yageo.com/documents/recent/PYu-RC_Group_51_RoHS_L_9.pdf?src-supplier=Mouser, ComponentLink2URL=http://www.yageo.com/documents/recent/PYu-RC_Group_51_RoHS_L_9.pdf?src-supplier=Mouser, ComponentLink3Description=http://documents.rs-components.com/techlib://itc_doclist_GB.htm?stockno=6186532&src-supplier=RSComponents, ComponentLink3URL=http://documents.rs-components.com/techlib://itc_doclist_GB.htm?stockno=6186532&src-supplier=RSComponents, ComponentLink4Description=http://www.yageo.com/documents/recent/PYu-RC0402_51_RoHS_L_6_r.pdf?src-supplier=Future+Electronics, ComponentLink4URL=http://www.yageo.com/documents/recent/PYu-RC0402_51_RoHS_L_6_r.pdf?src-supplier=Future+Electronics, Construction=Rectangular, Depth=0.5mm, Features="Moisture Resistant", Height=0.35mm, Lead Free="Lead Free", Length=1mm, Manufacturer Part Number=RC0402FR-072K2L, Military Standard=Not, Number of Terminations=2, Packaging="Tape and Reel", Power Rating=63mW, Pricing 1="1=0.1, 10=0.016, 100=0.0066, 1000=0.00299, 2500=0.00259, 5000=0.00214 (USD)", REACH SVHC=Unknown, RoHS Compliant=Yes, Series=RC, Size Code=0402, Stock 1=966157, Supplier 1=Digi-Key, Technology="THICK FILM", Termination=SMD/SMT, Tolerance=1%, Weight=2.3E-05oz, Width=0.5mm
R3: library part RC0402FR-070RL, "RES 0 OHM JUMPER 1/16W 0402", Case Code (Imperial)=0402, Case Code (Metric)=1005, LCSC Part Number=C106231, Manufacturer=Yageo, Max Operating Temperature=155°C, Max Power Dissipation=63mW, Min Operating Temperature=-55°C, Power Rating=62.5mW, Resistance=0R, Resistor Type="Thick Film", Supplier Part Number 1=603-RC0402FR-070RL, Temperature Coefficient=200ppm/°C, Tolerance=1%, Voltage Rating=50V, Case/Package=0402, ComponentLink1Description=https://datasheet.ciiva.com/8896/pyu-rc0402-51-rohs-l-6-8896149.pdf?src-supplier=Avnet, ComponentLink1URL=https://datasheet.ciiva.com/8896/pyu-rc0402-51-rohs-l-6-8896149.pdf?src-supplier=Avnet, ComponentLink2Description=https://datasheet.ciiva.com/16790/pyu-rc0402-51-rohs-l-6-r-16790444.pdf?src-supplier=Future+Electronics, ComponentLink2URL=https://datasheet.ciiva.com/16790/pyu-rc0402-51-rohs-l-6-r-16790444.pdf?src-supplier=Future+Electronics, Contact Plating=Tin,Matte, Features="Moisture Resistant", Height=0.35mm, Item Type=Resistors, Lead Free="Lead Free", Length=1mm, Manufacturer Part Number=RC0402FR-070RL, Mount="Surface Mount", Number of Terminations=2, Packaging="Tape and Reel", Pricing 1="1=0.10000, 10=0.01400, 50=0.01400, 100=0.00600, 1000=0.00300, 5000=0.00200, 10000=0.00100 (USD)", Radiation Hardening=No, RoHS=Yes, RoHS Compliant=Yes, Series=RC, Size Code=0402, Stock 1=8556842, Supplier 1=Mouser, Termination=SMD/SMT, Width=0.5mm
R4: library part RC0402FR-070RL, "RES 0 OHM JUMPER 1/16W 0402", Case Code (Imperial)=0402, Case Code (Metric)=1005, LCSC Part Number=C106231, Manufacturer=Yageo, Max Operating Temperature=155°C, Max Power Dissipation=63mW, Min Operating Temperature=-55°C, Power Rating=62.5mW, Resistor Type="Thick Film", Supplier Part Number 1=603-RC0402FR-070RL, Temperature Coefficient=200ppm/°C, Tolerance=1%, Voltage Rating=50V, Case/Package=0402, ComponentLink1Description=https://datasheet.ciiva.com/8896/pyu-rc0402-51-rohs-l-6-8896149.pdf?src-supplier=Avnet, ComponentLink1URL=https://datasheet.ciiva.com/8896/pyu-rc0402-51-rohs-l-6-8896149.pdf?src-supplier=Avnet, ComponentLink2Description=https://datasheet.ciiva.com/16790/pyu-rc0402-51-rohs-l-6-r-16790444.pdf?src-supplier=Future+Electronics, ComponentLink2URL=https://datasheet.ciiva.com/16790/pyu-rc0402-51-rohs-l-6-r-16790444.pdf?src-supplier=Future+Electronics, Contact Plating=Tin,Matte, Features="Moisture Resistant", Height=0.35mm, Item Type=Resistors, Lead Free="Lead Free", Length=1mm, Manufacturer Part Number=RC0402FR-070RL, Mount="Surface Mount", Number of Terminations=2, Packaging="Tape and Reel", Pricing 1="1=0.10000, 10=0.01400, 50=0.01400, 100=0.00600, 1000=0.00300, 5000=0.00200, 10000=0.00100 (USD)", Radiation Hardening=No, Resistance=0R, RoHS=Yes, RoHS Compliant=Yes, Series=RC, Size Code=0402, Stock 1=8556842, Supplier 1=Mouser, Termination=SMD/SMT, Width=0.5mm
TP1 TP2: "Test Point ON", Item Type="TEST POINT"
U1: "IC RF TXRX+MCU BLE 32QFN", LCSC Part Number=C519278, Manufacturer="Nordic Semiconductor", Item Type=IC, Manufacturer Part Number=NRF52810-QCAA-R, Pricing="1=2.26, 100=1.92, 500=1.67, 1000=1.52 (USD)", RoHS=Yes, RoHS Compliant=Yes, Stock=11942, Supplier=Digikey
U2: "SHTC3 Series Digital ±2% RH SMT Humidity Temperature Sensor - DFN-8", LCSC Part Number=C194656, Manufacturer=Sensirion, ComponentLink1Description=https://datasheet.octopart.com/SHTC3-TR-2.5KS-Sensirion-datasheet-166628637.pdf?src-supplier=Future+Electronics, ComponentLink1URL=https://datasheet.octopart.com/SHTC3-TR-2.5KS-Sensirion-datasheet-166628637.pdf?src-supplier=Future+Electronics, Item Type=IC, Manufacturer Part Number=SHTC3-TR-2.5KS, Pricing="1=2.72, 5=2.292, 10=2.129, 25=1.932, 50=1.7952, 100=1.6682, 500=1.40712, 1000=1.30776 (USD)", RoHS=No, Stock=21685, Supplier=Digikey
X1: library part Q22FA12800025, "CRYSTAL 32.0000MHZ 8PF SMD", LCSC Part Number=C187794, Manufacturer=Epson, ComponentLink1Description=http://ndap3-net.ebz.epson.co.jp/w/www/PDFS/epdoc_qd.nsf/85a4e2c523a1f89349257068002f9e30/255cb2884010a1f9492571f0004c7d72/$FILE/FA-128_E09X.pdf?src-supplier=Newark, ComponentLink1URL=http://ndap3-net.ebz.epson.co.jp/w/www/PDFS/epdoc_qd.nsf/85a4e2c523a1f89349257068002f9e30/255cb2884010a1f9492571f0004c7d72/$FILE/FA-128_E09X.pdf?src-supplier=Newark, ComponentLink2Description=http://www.farnell.com/datasheets/1734615.pdf?src-supplier=Newark, ComponentLink2URL=http://www.farnell.com/datasheets/1734615.pdf?src-supplier=Newark, Item Type=Crystal, Manufacturer Part Number=Q22FA12800025, Pricing="250=0.511 (GBP)", RoHS=Yes, Stock=250, Supplier=Farnell
X2: library part Q13MC14620001, "32.768kHz 7pF ±20ppm MC-146 Crystals ROHS", LCSC Part Number=C3013800, Manufacturer="Seiko Epson", Package=MC-146, ComponentLink1Description=LCSC, ComponentLink1URL=https://www.lcsc.com/product-detail/Crystals_Seiko-span-style-background-color-ff0-Epson-span-Q13MC14620001_C3013800.html, Item Type=Crystals, Manufacturer Part Number=Q13MC14620001

## Free pads (board coordinates)
  round 0 hole 90.55 unplated: MH(0,0) MH(1082.68,-1875.25)

## Via types
v1: diameter 23.62, hole 11.81, Top Layer to Bottom Layer, tented both sides, 98 vias

## Nets (pads, with @x,y where several pads share a name; then routed paths per layer and width w, separated by ;. In a path a pad name is that pad's centre, name@x,y a point inside that pad or via, vN(x,y) a via of type N, cw(c..) or ccw(c..) an arc to the next point about the centre after c; other vN are vias at no path point)
3V: C2.2 C3.2 C14.2 C15.2 J1.1 J1.2 J2.1 R1.2 R2.2 U1.9 U1.25 U1.32 U2.1 | length 605.4
  Bottom Layer w10: 1240.24,-982.6 1277.14,-1019.5 R1.2
  Bottom Layer w15: J2.1 618.9,-1354.29 v1(618.9,-1422.48) ; v1(1065,-877.27) 1106.72,-919 1229.7,-919 ; 1240.24,-982.6 1229.7,-972.06 1229.7,-919 ; C15.2 1229.7,-919
  other v1: 452.7,-1680.01 644.77,-1680.01 548.74,-1679.39 556.36,-702 588.92,-702 389.4,-394.01 615,-353.51 646.19,-353.51 468.74,-182.12 372.7,-181.5 564.77,-181.5
ANT: C13.2 R4.2 | length 0
DEC1: C6.2 U1.1 | length 114.6
  Bottom Layer w10: U1.1 656.59,-474.41 676.87,-454.13 C6.2
DEC2: C10.2 U1.21 | length 87.9
  Bottom Layer w8: C10.2 293.97,-533.47 U1.21
DEC3: C8.1 U1.22 | length 97.2
  Bottom Layer w8: C8.1 314,-492 335.78,-513.78 U1.22
DEC4: C1.1 L1.1 U1.30 | length 89.2
  Bottom Layer w8: U1.30 507.4,-446.66 507.4,-357.96 507.58,-357.78
GND: C1.2 C2.1 C3.1 C4.2 C5.2 C6.1 C7.2 C8.2 C9.2 C10.1 C11.1 C12.2 C13.1 C14.1 C15.1 J1.3 J2.2 J3.2 J3.3 U1.20 U1.29 U1.33 U2.4 U2.5 X1.2 X1.4 | length 899.7
  Top Layer w11.81: v1(1065,-984) 1092.28,-956.72 1285.31,-956.72 1292.23,-963.65 v1(1292.23,-990.27)
  Bottom Layer w8: v1(222,-533) 223.79,-531.21 251.18,-531.21 256.14,-526.25 C10.1@256.14,-522.75 ; v1(222.01,-493.16) 251.18,-493.16 256.15,-488.19 C8.2@256.15,-482.91 ; v1(263.49,-609.88) C11.1 ; 271.59,-325.53 295.67,-301.45 ; C11.1 C11.1 ; U1.20 467.84,-553.15 v1(477.69,-543.31) ; C3.1@422.9,-357.74 C3.1 422.96,-355.23 C3.1@429.03,-355.23 ; C14.1@631.93,-670.23 v1(665.99,-670.23) ; v1@639.88,-626.69 C9.2@639.88,-592.64 ; C2.1 v1(749.14,-396.67) ; C6.1@715.09,-450.59 v1(749.14,-450.59) ; v1(750.39,-625.5) C5.2@750.39,-591.45 ; C15.1 1280.19,-977 1292.23,-989.04 v1(1292.23,-990.27)
  Bottom Layer w10: C1.2 467.83,-404.03 471.83,-408.03 472.45,-408.03 487.52,-423.1 U1.29 487.52,-533.47 v1(477.69,-543.31)
  other v1: 875.39,-1568.05 68.98,-1567.3 875.39,-1514.92 68.98,-1514.16 875.39,-1461.78 68.98,-1461.03 875.39,-1408.64 68.98,-1407.89 68.98,-1354.75 875.39,-1355.5 68.98,-1301.62 875.39,-1302.37 875.39,-1249.23 68.98,-1248.48 875.39,-1196.09 68.98,-1195.34 875.39,-1142.96 68.98,-1142.21 875.39,-1089.82 68.98,-1089.07 875.39,-1036.68 68.98,-1035.93 394.66,-1013.96 460.99,-1013.96 527.32,-1013.96 68.98,-982.8 875.39,-983.55 527.7,-937.63 395.04,-936.87 461.37,-937.25 1350.19,-937.5 68.98,-929.66 875.39,-877.27 68.98,-876.52 395.42,-860.54 461.75,-860.54 528.08,-860.54 875.39,-824.14 68.98,-823.38 875.39,-771 68.98,-770.25 297.54,-770.25 68.98,-717.11 297.54,-717.11 68.98,-663.97 297.54,-663.97 -3.3,-649.57 190.68,-632.65 639.88,-625.5 875.39,-611.59 68.98,-610.84 477.34,-590.26 875.39,-543.6 430.73,-542.97 524.64,-542.97 161.08,-531.21 100.17,-529.41 3.75,-517.92 478.03,-496.36 68.98,-489.71 875.39,-490.46 875.39,-437.32 68.98,-436.57 308.02,-434.9 875.39,-384.19 68.98,-383.44 875.39,-331.05 68.98,-330.3 302.82,-288.13 875.39,-277.91 68.98,-277.16
NetC11_2: C11.2 L3.1 U1.19
NetJ3_1: J3.1 R3.2 | length 119.3
  Bottom Layer w12: J3.1 128.68,-727.71 R3.2
NetL1_2: L1.2 L2.1
NetL2_2: L2.2 U1.31 | length 105.4
  Bottom Layer w8: U1.31 526.89,-422.65 546.56,-402.98 L2.2
RF: C12.1 L3.2 R3.1 R4.1 | length 160.5
  Bottom Layer w12: R4.1 R3.1 C12.1 L3.2
SCL: R2.1 TP2.1 U1.11 U2.2 | length 1700
  Top Layer w8: v1(649.68,-1262.71) 688.13,-1224.26 688.13,-1053.72 827.05,-914.8 1220.87,-914.8 1281.18,-854.5 v1(1398.7,-854.5)
  Bottom Layer w8: U1.11 507.21,-734.01 649.68,-876.48 v1(649.68,-1262.71)
SDA_: R1.1 TP1.1 U1.10 U2.3 | length 1822.7
  Top Layer w8: v1(749.38,-1262.4) 711.17,-1224.19 711.17,-1064.85 842.63,-933.39 1232.77,-933.39 1289.16,-877 1376,-877 1398.7,-899.7 v1(1398.7,-1019.5)
  Bottom Layer w8: U1.10 526.89,-722.69 671.34,-867.13 671.34,-1184.36 v1(749.38,-1262.4)
SWDCLK: J2.3 U1.17 | length 684.1
  Bottom Layer w8: J2.3 330.47,-1208.53 346.92,-1192.08 346.92,-625.08 359.79,-612.21 U1.17
SWDIO: J2.4 U1.18 | length 751.1
  Bottom Layer w8: J2.4 328.19,-1166.56 328.19,-612.89 348.57,-592.52 U1.18
XC1: C7.1 U1.23 X1.3 | length 257.4
  Bottom Layer w8: C7.1 261.5,-365.9 261.5,-382.51 X1.3 259.4,-401.23 250.84,-409.78 250.84,-425.46 289.92,-464.54 321.4,-464.54 350.96,-494.1 U1.23
XC2: C4.1 U1.24 X1.1 | length 185
  Bottom Layer w8: C4.1 334.56,-369.02 X1.1 331.78,-379.05 331.78,-395.66 340.34,-404.23 340.34,-455.09 359.66,-474.41 U1.24
XL1: C5.1 U1.2 X2.1 | length 227.2
  Bottom Layer w8: U1.2 697.18,-494.1 713.07,-509.98 X2.1 ; X2.1 C5.1
XL2: C9.1 U1.3 X2.4 | length 171.5
  Bottom Layer w10: U1.3 659.9,-513.78 670.83,-524.71 670.83,-547.56 X2.4 ; C9.1 X2.4@677.6,-554.41
pads on no net: U1.4 U1.5 U1.6 U1.7 U1.8 U1.12 U1.13 U1.14 U1.15 U1.16 U1.26 U1.27 U1.28 X2.2 X2.3

## Polygon pours and split planes (outlines as drawn)
GND on Top Layer "NONET_L01_P-001" (solid, pour order 0): 840.81,-1771.29 916.77,-1902.85 ccw(c1053.15,-1824.11) 1189.53,-1745.37 1113.58,-1613.81 ccw(c546.11,-941.4) 1413.98,-1086.18 1282.39,-1086.18 1197.7,-1001.5 1116.7,-1001.5 1116.7,-871.5 1197.7,-871.5 1282.39,-786.81 1413.98,-786.81 1414.23,-786.77 ccw(c541.34,-937.62) 241.86,-103.96 165.91,27.6 ccw(c29.53,-51.14) -106.85,-129.88 -30.9,-261.44 ccw(c541.34,-937.63)
GND on GND "NONET_L01_P-001" (solid, pour order 1): 840.81,-1771.29 916.77,-1902.85 ccw(c1053.15,-1824.11) 1189.53,-1745.37 1113.58,-1613.81 ccw(c546.11,-941.4) 1413.98,-1086.18 1282.39,-1086.18 1197.7,-1001.5 1106.72,-1001.5 1106.72,-871.5 1197.7,-871.5 1282.39,-786.81 1413.98,-786.81 1414.23,-786.77 ccw(c541.34,-937.62) 241.86,-103.96 165.91,27.6 ccw(c29.53,-51.14) -106.85,-129.88 -30.9,-261.44 ccw(c541.34,-937.63)
3V on PWR "NONET_L01_P-001" (solid, pour order 2): 840.81,-1771.29 916.77,-1902.85 ccw(c1053.15,-1824.11) 1189.53,-1745.37 1113.58,-1613.81 ccw(c546.11,-941.4) 1413.98,-1086.18 1282.39,-1086.18 1197.7,-1001.5 1106.72,-1001.5 1106.72,-871.5 1197.7,-871.5 1282.39,-786.81 1413.98,-786.81 1414.23,-786.77 ccw(c541.34,-937.62) 241.86,-103.96 165.91,27.6 ccw(c29.53,-51.14) -106.85,-129.88 -30.9,-261.44 ccw(c541.34,-937.63)
GND on Bottom Layer "NONET_L01_P-001" (solid, pour order 3): 840.81,-1771.29 916.77,-1902.85 ccw(c1053.15,-1824.11) 1189.53,-1745.37 1113.58,-1613.81 ccw(c546.11,-941.4) 1413.98,-1086.18 1282.39,-1086.18 1197.7,-1001.5 1106.72,-1001.5 1106.72,-871.5 1197.7,-871.5 1282.39,-786.81 1413.98,-786.81 1414.23,-786.77 ccw(c541.34,-937.62) 241.86,-103.96 165.91,27.6 ccw(c29.53,-51.14) -106.85,-129.88 -30.9,-261.44 ccw(c541.34,-937.63)

## Other copper
Top Layer:
  rectangle net GND: 1278.7,-1003.29 1365.17,-924.59
  rectangle net 3V: 351.11,-457.32 588.7,-163.5
  rectangle net 3V: 372.7,-409.5 493.8,-377.5
  rectangle net 3V: 351.37,-1699.5 666.33,-1402.19
Bottom Layer:
  rectangle net NetC11_2: 250.91,-578.35 395,-566.35
  rectangle net 3V: 598.68,-458 632.68,-337.76
  rectangle net 3V: 598.68,-417.71 662.68,-337.76
  rectangle net ANT: -15.56,-585.34 45.66,-560.34
  rectangle: -260.81,-1285.05 -210.82,-1255.34
  region net GND: 289.12,-399.37 272.75,-415.74 299.82,-442.82 316.2,-426.44
  rectangle net 3V: 377.17,-409.86 435.46,-379.54
  rectangle net GND: 1267.69,-987.5 1341.23,-939
  rectangle net GND: 1317.7,-951.28 1381.68,-923.72
  rectangle net GND: 1309.3,-987.5 1341.23,-923.72
  rectangle net GND: 247.18,-545.21 265.19,-480.37
  rectangle net 3V: 1266.7,-928 1295.7,-889.91
  region net 3V: 1340.72,-912.5 1340.72,-889.91 1266.7,-889.91 1266.7,-912.5
  region net SDA_: 1413.98,-963.68 1359.69,-963.68 1359.69,-1036.5 1413.98,-1036.5
  rectangle net SCL: 1359.69,-911.32 1413.98,-838.5
  rectangle net 3V: 1322.7,-911.32 1340.69,-842
  rectangle net 3V: 541.07,-715.5 603.89,-627.5
  rectangle net 3V: 541.07,-682.77 552.09,-625.99
  rectangle net 3V: 541.07,-460.63 552.09,-433.07
  rectangle net 3V: 541.07,-458 632.68,-433.07
  rectangle net NetL1_2: 528.56,-306.26 562.31,-268.5
  rectangle net NetL1_2: 466.24,-282.64 562.31,-268.5
  rectangle net NetL1_2: 466.24,-323.95 481.99,-268.5
  rectangle net DEC4: 492.7,-370.28 516.58,-298.5
  rectangle net 3V: 403.27,-460.63 414.29,-385.8
  region net GND: 301.84,-249.55 240.1,-311.29 300.11,-371.31 361.86,-309.57
  pour cut-out: 161.08,-691.7 161.08,-765.72 247.7,-765.72 247.7,-691.7
  pour cut-out: -34,-534 45.66,-534 45.66,-608 -34,-608
Multi-Layer:
  pour cut-out: -344.91,-1613.81 -32.93,-1613.81 -34.04,-261.44 -344.78,-261.44

## Silkscreen, mask and mechanical layers (free items; w line width, h text height)
Top Overlay:
  text "BATTERY CR2477" at 1054.2,-1307.35 h60 r90
Bottom Overlay:
  text "SWDIO" at 216.05,-1199.34 h39.37 r270
  text "SWDCLK" at 314.47,-1199.09 h39.37 r270
  text "GND" at 412.9,-1198.78 h39.37 r270
  text "3V3" at 510.27,-1198.78 h39.37 r270
  text "SDA" at 633.68,-1198.78 h39.37 r270
  text "SCL" at 731.68,-1198.78 h39.37 r270
Board Outline:
  lines w10: 1413.98,-786.81 1282.39,-786.81 1197.7,-871.5 1116.7,-871.5 1116.7,-900.71 1208.49,-900.71 1294.64,-814.56 1418,-814.56 cw(c621.35,-936.5) 1418,-1058.44 1294.64,-1058.44 1208.49,-972.29 1116.7,-972.29 1116.7,-1001.5 1197.7,-1001.5 1282.39,-1086.18 1413.98,-1086.18 cw(c546.11,-941.39) 1113.58,-1613.81 1189.53,-1745.37 cw(c1053.15,-1824.11) 916.77,-1902.85 840.81,-1771.29 cw(c541.34,-937.63) -30.9,-261.44 -106.85,-129.88 cw(c29.53,-51.14) 165.91,27.6 241.86,-103.96 cw(c541.34,-937.63) 1414.23,-786.77
Fab:
  drawing of 295 lines, arcs and shapes, not listed
  text "Layer" at 2246.5,633 h60
  text "Name" at 2656.41,633 h60
  text "Material" at 3586.16,633 h60
  text "Thickness" at 4445.92,633 h60
  text "Constant" at 5095.76,633 h60
  text "Board Layer Stack" at 5665.62,633 h60
  text "Top Overlay" at 2656.41,513 h60
  text "Top Solder" at 2656.41,393 h60
  text "Solder Resist" at 3586.16,393 h60
  text "0.010mm" at 4445.92,393 h60
  text "3.5" at 5095.76,393 h60
  text "1" at 2246.5,273 h60
  text "Top Layer" at 2656.41,273 h60
  text "0.035mm" at 4445.92,273 h60
  text "Dielectric 2" at 2656.41,153 h60
  text "PP-006" at 3586.16,153 h60
  text "0.203mm" at 4445.92,153 h60
  text "4.4" at 5095.76,153 h60
  text "2" at 2246.5,33 h60
  text "PWR" at 2656.41,33 h60
  text "CF-004" at 3586.16,33 h60
  text "0.030mm" at 4445.92,33 h60
  text "Dielectric 1" at 2656.41,-87 h60
  text "FR-4" at 3586.16,-87 h60
  text "1.030mm" at 4445.92,-87 h60
  text "4.6" at 5095.76,-87 h60
  text "3" at 2246.5,-207 h60
  text "GND" at 2656.41,-207 h60
  text "CF-004" at 3586.16,-207 h60
  text "0.030mm" at 4445.92,-207 h60
  text "Dielectric 3" at 2656.41,-327 h60
  text "PP-006" at 3586.16,-327 h60
  text "0.203mm" at 4445.92,-327 h60
  text "4.4" at 5095.76,-327 h60
  text "4" at 2246.5,-447 h60
  text "Bottom Layer" at 2656.41,-447 h60
  text "0.035mm" at 4445.92,-447 h60
  text "Bottom Solder" at 2656.41,-567 h60
  text "Solder Resist" at 3586.16,-567 h60
  text "0.010mm" at 4445.92,-567 h60
  text "3.5" at 5095.76,-567 h60
  text "Bottom Overlay" at 2656.41,-687 h60
  text "Total board thickness:" at 2246.5,-807 h60
  text "1.586mm" at 4445.92,-807 h60
Drill Drawing:
  circle w10: c-184.38,1315.83 r33.33
  lines w10: -217.71,1199.17 -151.04,1199.17 -184.38,1132.5 -217.71,1199.17
  lines w15: -277.5,1087.5 6732.6,1087.5 ; -277.5,1387.5 6732.6,1387.5 ; 273.38,937.5 273.38,1537.5 ; 863.22,937.5 863.22,1537.5 ; 1962.9,937.5 1962.9,1537.5 ; 2468.78,937.5 2468.78,1537.5 ; 3202.58,937.5 3202.58,1537.5 ; 4702.13,937.5 4702.13,1537.5 ; 5291.98,937.5 5291.98,1537.5 ; 6037.78,937.5 6037.78,1537.5 ; -277.5,937.5 6732.6,937.5 6732.6,1537.5 -277.5,1537.5 -277.5,937.5
  text "Symbol" at -187.5,1432.5 h72
  text "Count" at 318.38,1432.5 h72
  text "Hole Size" at 908.22,1432.5 h72
  text "Plated" at 2007.9,1432.5 h72
  text "Hole Type" at 2513.78,1432.5 h72
  text "Drill Layer Pair" at 3247.58,1432.5 h72
  text "Via/Pad" at 4747.13,1432.5 h72
  text "Pad Shape" at 5336.98,1432.5 h72
  text "Template" at 6082.78,1432.5 h72
  text "2" at 318.38,1282.5 h60
  text "90.55mil (2.300mm)" at 908.22,1282.5 h60
  text "NPTH" at 2007.9,1282.5 h60
  text "Round" at 2513.78,1282.5 h60
  text "Top Layer - Bottom Layer" at 3247.58,1282.5 h60
  text "Pad" at 4747.13,1282.5 h60
  text "Rounded" at 5336.98,1282.5 h60
  text "c0hn230" at 6082.78,1282.5 h60
  text "98" at 318.38,1132.5 h60
  text "11.81mil (0.300mm)" at 908.22,1132.5 h60
  text "PTH" at 2007.9,1132.5 h60
  text "Round" at 2513.78,1132.5 h60
  text "Top Layer - Bottom Layer" at 3247.58,1132.5 h60
  text "Via" at 4747.13,1132.5 h60
  text "Rounded" at 5336.98,1132.5 h60
  text "v60h30" at 6082.78,1132.5 h60
  text "100 Total" at 318.38,982.5 h60